# Altium PCB PCB-PWR.PcbDoc (part 1 of 2)
Units mm, origin at the board's own origin, x right, y up, seen from the top; angles counter-clockwise.
Board outline 90 x 60 mm, 4 copper layers (F.Cu, In1.Cu, In2.Cu, B.Cu); 66 components, 31 nets, 210 pads, 267 vias.
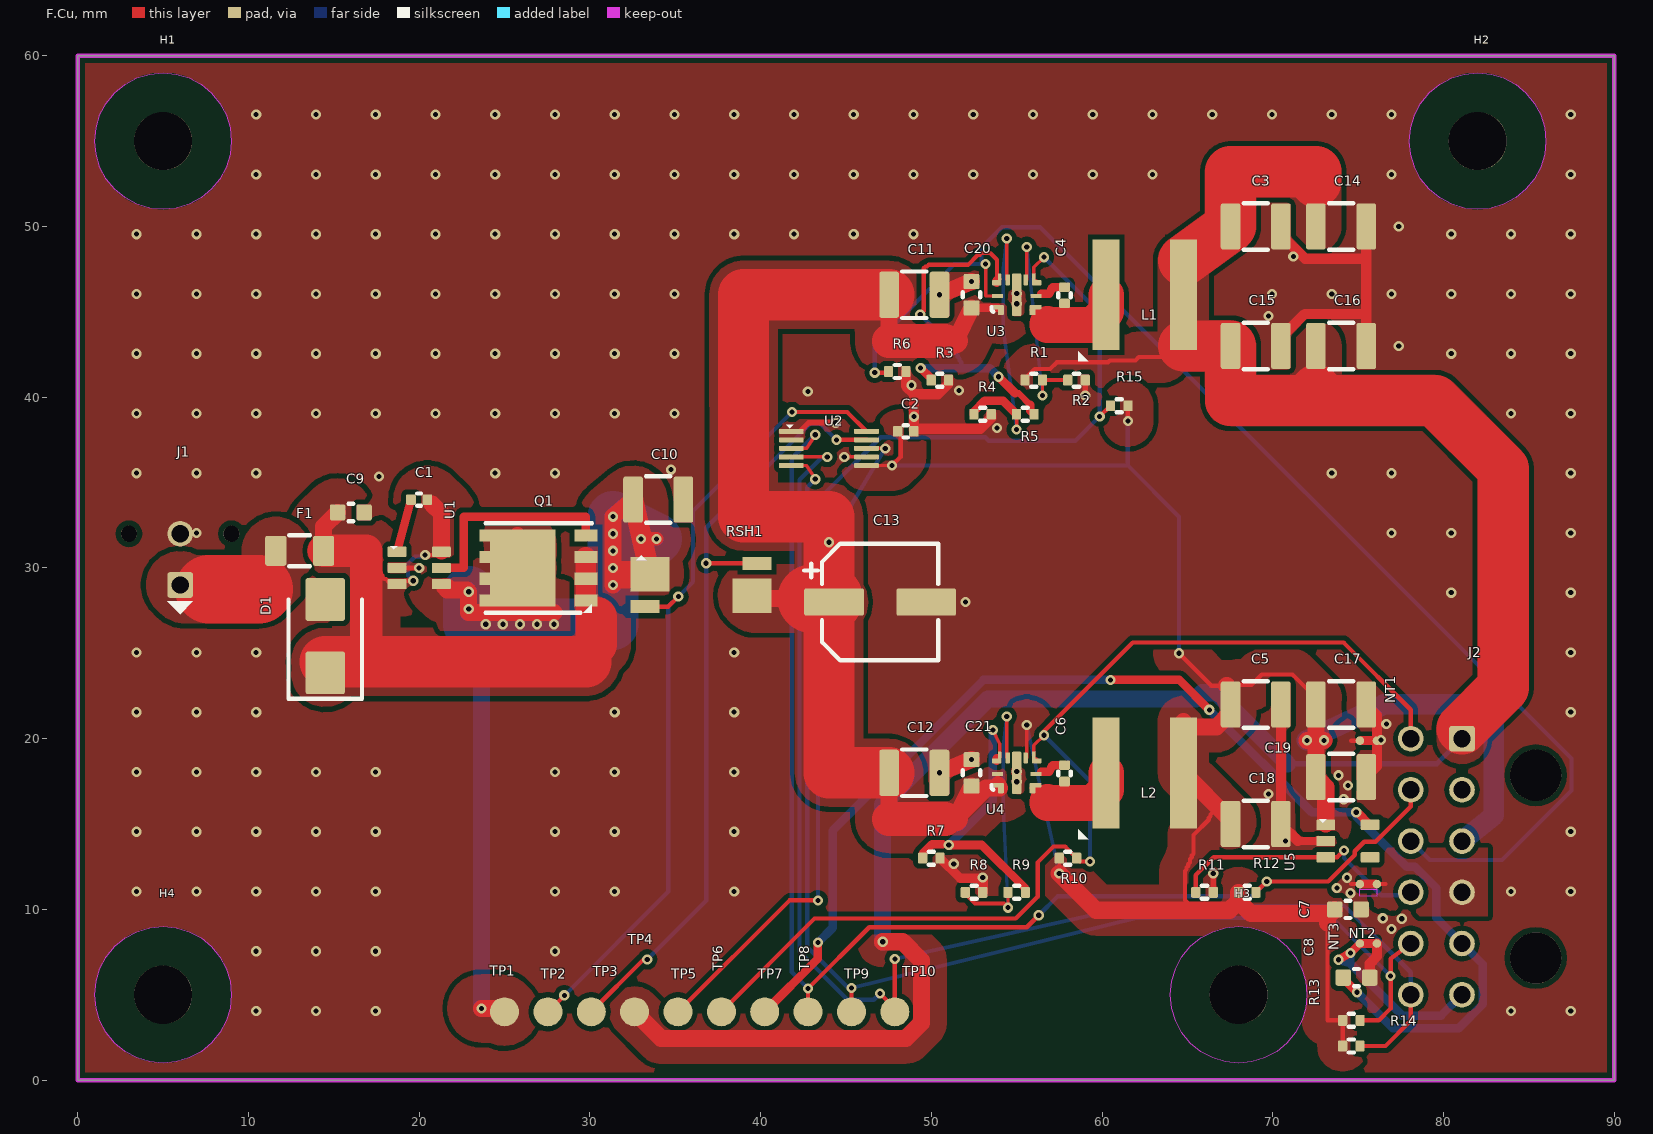
[diagram p0: F.Cu view]
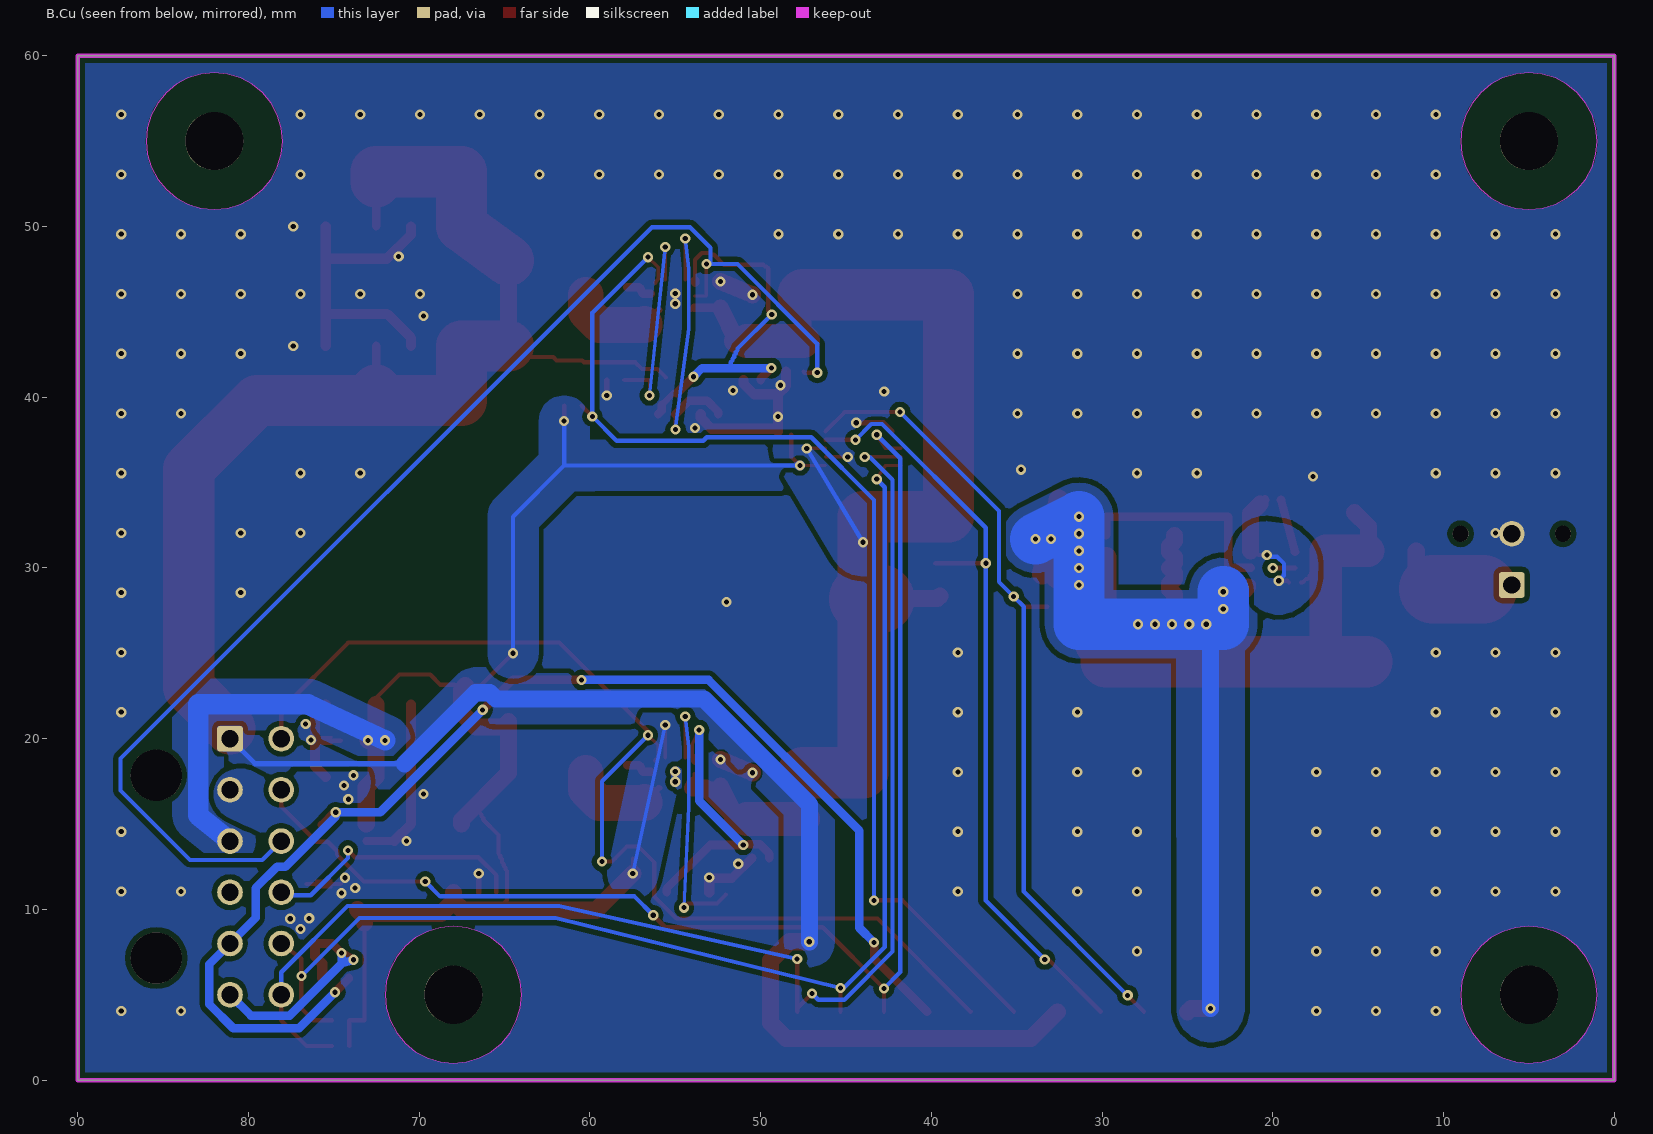
[diagram p1: B.Cu view, seen from below]
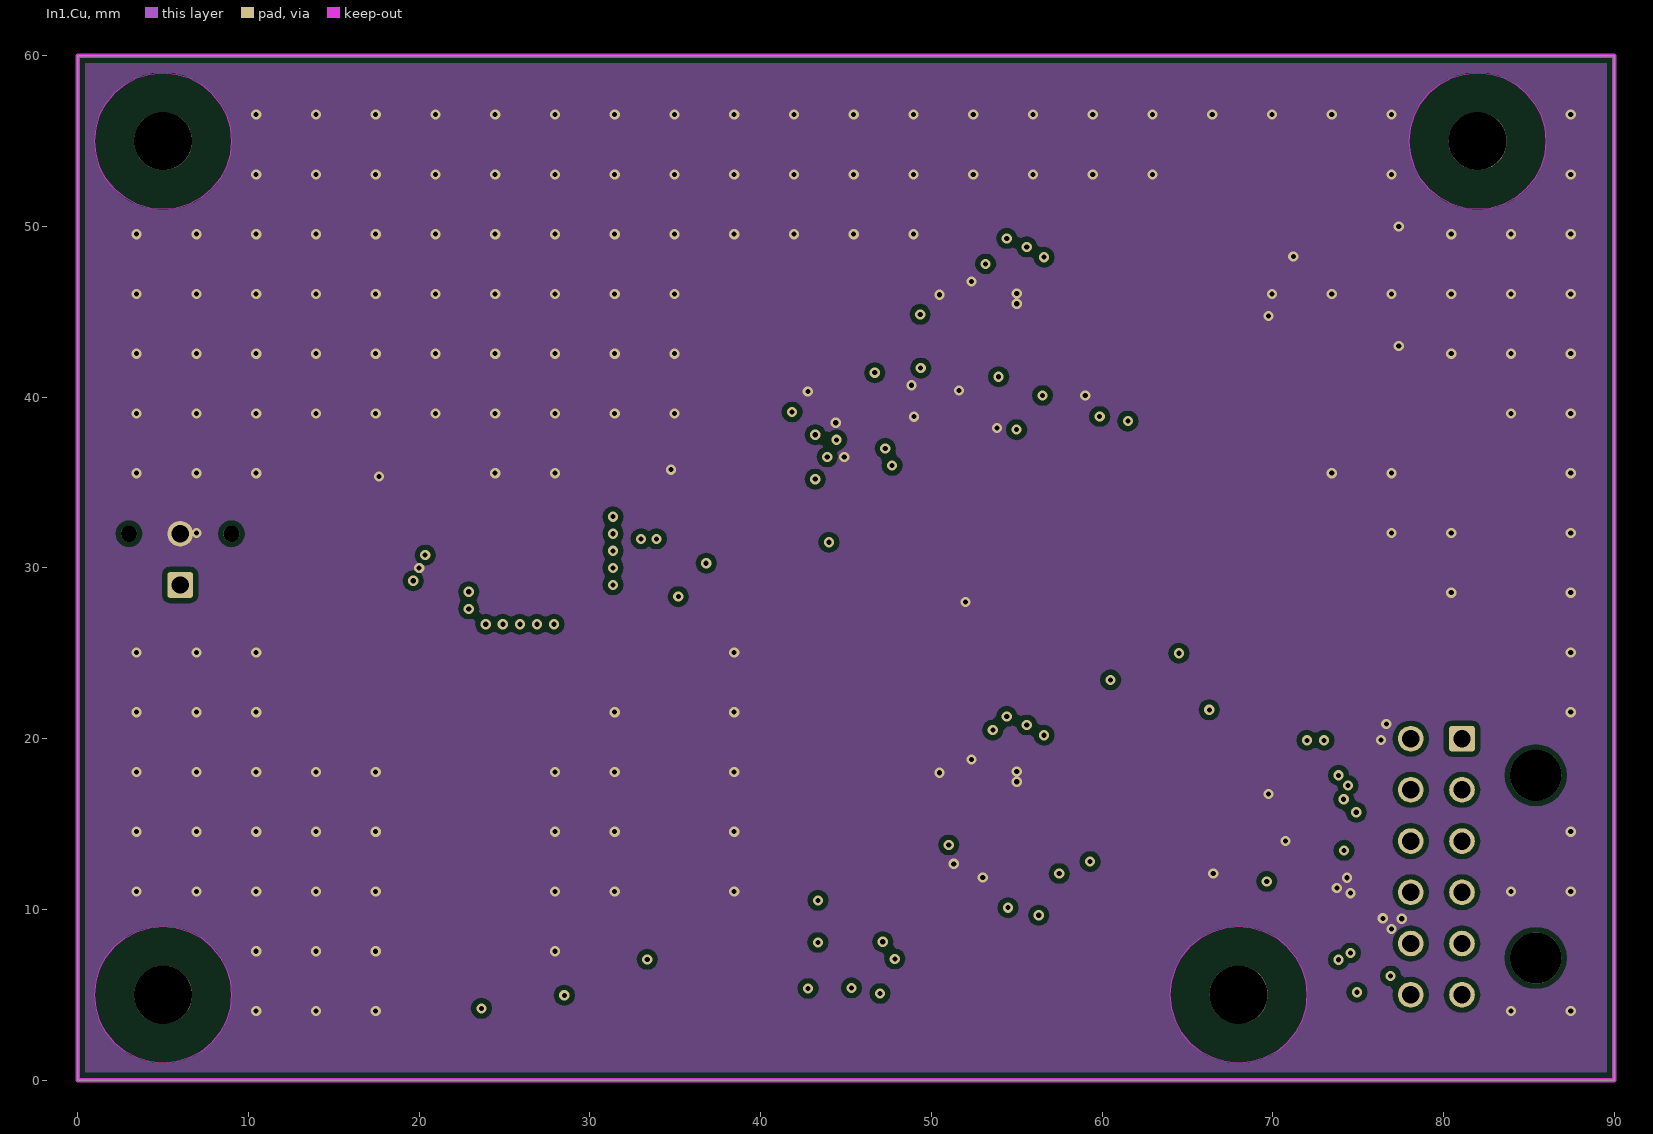
[diagram p2: In1.Cu]
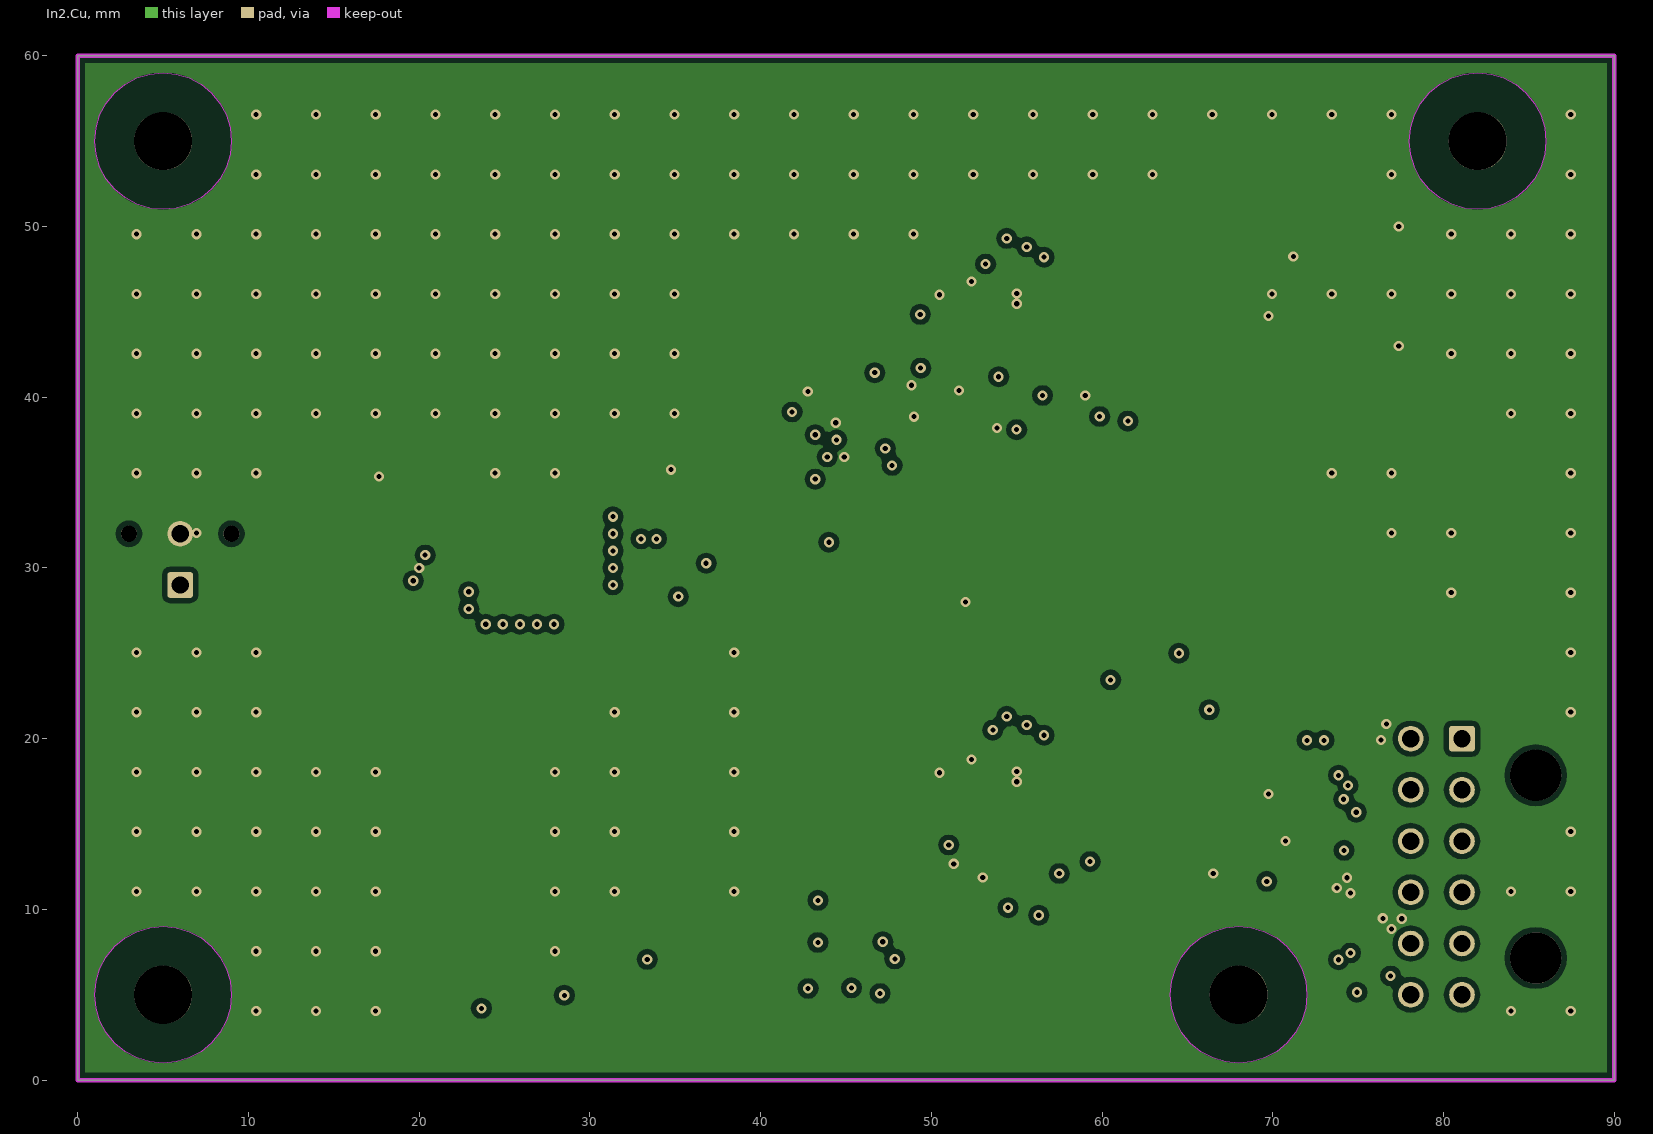
[diagram p3: In2.Cu]

## Layer stack, top to bottom
F.Mask: solder mask 0.0102, Solder Resist, Dk 3.5
F.Cu: signal copper 0.0356
Dielectric 1: dielectric 0.32, FR-4, Dk 4.8
In1.Cu: signal copper 0.0356
Dielectric2: dielectric 0.32, FR-4, Dk 4.8
In2.Cu: signal copper 0.0356
Dielectric3: dielectric 0.32, FR-4, Dk 4.8
B.Cu: signal copper 0.0356
B.Mask: solder mask 0.0102, Solder Resist, Dk 3.5

## Board outline
0,0 0,60 90,60 90,0 0,0

## Design rules (kind name [scope] priority, off if disabled: settings)
Clearance "Clearence 2,3_PadClass" [InPadClass('Pad Class Clearance 2,3')] p1: gap=2.3 ignorepadtopadclearanceinfootprint=FALSE
Clearance "Clearence 0,3_Polygon" [InNamedPolygon('F.Cu-3V3_DIGITAL') OR InNamedPolygon('F.Cu-VBAT_SYS') OR InNamedPolygon('F.Cu-3V8_MODEM') OR InNamedPolygon('F.Cu-VBAT_PROTECTED') OR InNamedPolygon('F.Cu-VBAT_PROTECTED-1') OR InNamedPolygon('F.Cu-3V3_DIGITAL-1') OR InNamedPolygon('F.Cu-GND_MODEM') OR InNamedPolygon('F.Cu-3V3_DIGITAL-2') OR InNamedPolygon('F.Cu-GND_DIGITAL') OR InNamedPolygon('F.Cu-VBAT_FUSED') OR InNamedPolygon('F.Cu-3V8_MODEM-1') OR InNamedPolygon('F.Cu-GND_PWR') OR InNamedPolygon('F.Cu-3V3_DIGITAL-3') OR InNamedPolygon('F.Cu-VBAT_SYS-1') OR InNamedPolygon('F.Cu-VBAT_RAW') OR InNamedPolygon('B.Cu-3V3_DIGITAL') OR InNamedPolygon('B.Cu-3V3_DIGITAL-1') OR InNamedPolygon('B.Cu-GND_MODEM') OR InNamedPolygon('B.Cu-GND_PWR') OR InNamedPolygon('B.Cu-VBAT_PROTECTED') OR InNamedPolygon('B.Cu-VBAT_SYS') OR InNamedPolygon('B.Cu-3V8_MODEM') OR InNamedPolygon('B.Cu-3V3_DIGITAL-2') OR InNamedPolygon('B.Cu-VBAT_FUSED') OR InNamedPolygon('In1.Cu-GND_PWR') OR InNamedPolygon('In1.Cu-GND_PWR-1') OR InNamedPolygon('In1.Cu-GND_PWR-2') OR InNamedPolygon('In2.Cu-GND_PWR')] p2: gap=0.3 ignorepadtopadclearanceinfootprint=FALSE
HoleSize [All] p1: absolutevalues=TRUE maxlimit=3.4 minlimit=0.025 maxpercent=80.000 minpercent=20.000
MinimumSolderMaskSliver [All] p1: minsoldermaskwidth=0
PolygonConnect Polygon_In2.Cu-GND_PWR_ConnectDirect [IsNamedPolygon('In2.Cu-GND_PWR')] p1: connectstyle=Direct reliefconductorwidth=0.254 reliefentries=4 polygonreliefangle="90 Angle" airgapwidth=0.254
PolygonConnect Polygon_In1.Cu-GND_PWR-2_ConnectDirect [IsNamedPolygon('In1.Cu-GND_PWR-2')] p2: connectstyle=Direct reliefconductorwidth=0.254 reliefentries=4 polygonreliefangle="90 Angle" airgapwidth=0.254
PolygonConnect Polygon_In1.Cu-GND_PWR-1_ConnectDirect [IsNamedPolygon('In1.Cu-GND_PWR-1')] p3: connectstyle=Direct reliefconductorwidth=0.254 reliefentries=4 polygonreliefangle="90 Angle" airgapwidth=0.254
PolygonConnect Polygon_In1.Cu-GND_PWR_ConnectDirect [IsNamedPolygon('In1.Cu-GND_PWR')] p4: connectstyle=Direct reliefconductorwidth=0.254 reliefentries=4 polygonreliefangle="90 Angle" airgapwidth=0.254
PolygonConnect Polygon_B.Cu-VBAT_FUSED_ConnectDirect [IsNamedPolygon('B.Cu-VBAT_FUSED')] p5: connectstyle=Direct reliefconductorwidth=0.254 reliefentries=4 polygonreliefangle="90 Angle" airgapwidth=0.254
PolygonConnect Polygon_B.Cu-3V3_DIGITAL-2_ConnectDirect [IsNamedPolygon('B.Cu-3V3_DIGITAL-2')] p6: connectstyle=Direct reliefconductorwidth=0.254 reliefentries=4 polygonreliefangle="90 Angle" airgapwidth=0.254
PolygonConnect Polygon_B.Cu-3V8_MODEM_ConnectDirect [IsNamedPolygon('B.Cu-3V8_MODEM')] p7: connectstyle=Direct reliefconductorwidth=0.254 reliefentries=4 polygonreliefangle="90 Angle" airgapwidth=0.254
PolygonConnect Polygon_B.Cu-VBAT_SYS_ConnectDirect [IsNamedPolygon('B.Cu-VBAT_SYS')] p8: connectstyle=Direct reliefconductorwidth=0.254 reliefentries=4 polygonreliefangle="90 Angle" airgapwidth=0.254
PolygonConnect Polygon_B.Cu-VBAT_PROTECTED_ConnectDirect [IsNamedPolygon('B.Cu-VBAT_PROTECTED')] p9: connectstyle=Direct reliefconductorwidth=0.254 reliefentries=4 polygonreliefangle="90 Angle" airgapwidth=0.254
PolygonConnect Polygon_B.Cu-GND_PWR_ConnectDirect [IsNamedPolygon('B.Cu-GND_PWR')] p10: connectstyle=Direct reliefconductorwidth=0.254 reliefentries=4 polygonreliefangle="90 Angle" airgapwidth=0.254
PolygonConnect Polygon_B.Cu-GND_MODEM_ConnectDirect [IsNamedPolygon('B.Cu-GND_MODEM')] p11: connectstyle=Direct reliefconductorwidth=0.254 reliefentries=4 polygonreliefangle="90 Angle" airgapwidth=0.254
PolygonConnect Polygon_B.Cu-3V3_DIGITAL-1_ConnectDirect [IsNamedPolygon('B.Cu-3V3_DIGITAL-1')] p12: connectstyle=Direct reliefconductorwidth=0.254 reliefentries=4 polygonreliefangle="90 Angle" airgapwidth=0.254
PolygonConnect Polygon_B.Cu-3V3_DIGITAL_ConnectDirect [IsNamedPolygon('B.Cu-3V3_DIGITAL')] p13: connectstyle=Direct reliefconductorwidth=0.254 reliefentries=4 polygonreliefangle="90 Angle" airgapwidth=0.254
PolygonConnect Polygon_F.Cu-VBAT_RAW_ConnectDirect [IsNamedPolygon('F.Cu-VBAT_RAW')] p14: connectstyle=Direct reliefconductorwidth=0.254 reliefentries=4 polygonreliefangle="90 Angle" airgapwidth=0.254
PolygonConnect Polygon_F.Cu-VBAT_SYS-1_ConnectDirect [IsNamedPolygon('F.Cu-VBAT_SYS-1')] p15: connectstyle=Direct reliefconductorwidth=0.254 reliefentries=4 polygonreliefangle="90 Angle" airgapwidth=0.254
PolygonConnect Polygon_F.Cu-3V3_DIGITAL-3_ConnectDirect [IsNamedPolygon('F.Cu-3V3_DIGITAL-3')] p16: connectstyle=Direct reliefconductorwidth=0.254 reliefentries=4 polygonreliefangle="90 Angle" airgapwidth=0.254
PolygonConnect Polygon_F.Cu-GND_PWR_ConnectDirect [IsNamedPolygon('F.Cu-GND_PWR')] p17: connectstyle=Direct reliefconductorwidth=0.254 reliefentries=4 polygonreliefangle="90 Angle" airgapwidth=0.254
PolygonConnect Polygon_F.Cu-3V8_MODEM-1_ConnectDirect [IsNamedPolygon('F.Cu-3V8_MODEM-1')] p18: connectstyle=Direct reliefconductorwidth=0.254 reliefentries=4 polygonreliefangle="90 Angle" airgapwidth=0.254
PolygonConnect Polygon_F.Cu-VBAT_FUSED_ConnectDirect [IsNamedPolygon('F.Cu-VBAT_FUSED')] p19: connectstyle=Direct reliefconductorwidth=0.254 reliefentries=4 polygonreliefangle="90 Angle" airgapwidth=0.254
PolygonConnect Polygon_F.Cu-GND_DIGITAL_ConnectDirect [IsNamedPolygon('F.Cu-GND_DIGITAL')] p20: connectstyle=Direct reliefconductorwidth=0.254 reliefentries=4 polygonreliefangle="90 Angle" airgapwidth=0.254
PolygonConnect Polygon_F.Cu-3V3_DIGITAL-2_ConnectDirect [IsNamedPolygon('F.Cu-3V3_DIGITAL-2')] p21: connectstyle=Direct reliefconductorwidth=0.254 reliefentries=4 polygonreliefangle="90 Angle" airgapwidth=0.254
PolygonConnect Polygon_F.Cu-GND_MODEM_ConnectDirect [IsNamedPolygon('F.Cu-GND_MODEM')] p22: connectstyle=Direct reliefconductorwidth=0.254 reliefentries=4 polygonreliefangle="90 Angle" airgapwidth=0.254
PolygonConnect Polygon_F.Cu-3V3_DIGITAL-1_ConnectDirect [IsNamedPolygon('F.Cu-3V3_DIGITAL-1')] p23: connectstyle=Direct reliefconductorwidth=0.254 reliefentries=4 polygonreliefangle="90 Angle" airgapwidth=0.254
PolygonConnect Polygon_F.Cu-VBAT_PROTECTED-1_ConnectDirect [IsNamedPolygon('F.Cu-VBAT_PROTECTED-1')] p24: connectstyle=Direct reliefconductorwidth=0.254 reliefentries=4 polygonreliefangle="90 Angle" airgapwidth=0.254
PolygonConnect Polygon_F.Cu-VBAT_PROTECTED_ConnectDirect [IsNamedPolygon('F.Cu-VBAT_PROTECTED')] p25: connectstyle=Direct reliefconductorwidth=0.254 reliefentries=4 polygonreliefangle="90 Angle" airgapwidth=0.254
PolygonConnect Polygon_F.Cu-3V8_MODEM_ConnectDirect [IsNamedPolygon('F.Cu-3V8_MODEM')] p26: connectstyle=Direct reliefconductorwidth=0.254 reliefentries=4 polygonreliefangle="90 Angle" airgapwidth=0.254
PolygonConnect Polygon_F.Cu-VBAT_SYS_ConnectDirect [IsNamedPolygon('F.Cu-VBAT_SYS')] p27: connectstyle=Direct reliefconductorwidth=0.254 reliefentries=4 polygonreliefangle="90 Angle" airgapwidth=0.254
PolygonConnect Polygon_F.Cu-3V3_DIGITAL_ConnectDirect [IsNamedPolygon('F.Cu-3V3_DIGITAL')] p28: connectstyle=Direct reliefconductorwidth=0.254 reliefentries=4 polygonreliefangle="90 Angle" airgapwidth=0.254
RoutingVias [All] p1: holewidth=0.711 width=1.27 viastyle="Through Hole" minholewidth=0.711 minwidth=1.27 maxholewidth=0.711 maxwidth=1.27
SilkToSilkClearance [All] p1: silktosilkclearance=0
SilkToSolderMaskClearance [IsPad] p1: minsilkscreentomaskgap=0 clearancetoexposedcopper=TRUE
SolderMaskExpansion [All] p1: expansion=0 istentingtop=FALSE
Width [All] p1: maxlimit=10 minlimit=0.2 preferedwidth=0.25 minimp=50.000000 maximp=50.000000 favimp=50.000000
26 further rules are at their usual default settings.

## Classes and differential pairs
pad class "Pad Class Clearance 2,3": H1-Un1 H2-Un1 H3-Un1 H4-Un1

## Components (designator, comment, footprint, x,y, rotation, side; value= is the part's Value field where it differs from the comment)
C1 "Comment" C_0402_1005Metric 20,34 r0 top value="100 nF 25 V X7R CGA2B3X7R1E104K050BB"
C2 "Comment" C_0402_1005Metric 48.5,38 r0 top value="100 nF 25 V X7R CGA2B3X7R1E104K050BB"
C3 "Comment" C_1210_3225Metric 69,50 r0 top value="22 uF 25 V X7R CGA6P3X7R1E226M250AB"
C4 "Comment" C_0402_1005Metric 57.8,45.97 r270 top value="100 nF 25 V X7R CGA2B3X7R1E104K050BB"
C5 "Comment" C_1210_3225Metric 69,22 r0 top value="22 uF 25 V X7R CGA6P3X7R1E226M250AB"
C6 "Comment" C_0402_1005Metric 57.8,17.97 r270 top value="100 nF 25 V X7R CGA2B3X7R1E104K050BB"
C7 "Comment" C_0603_1608Metric 74.4,10 r0 top value="2.2 uF 10 V X7R CGA3E1X7R1A225K080AC"
C8 "Comment" C_0603_1608Metric 74.9,6 r0 top value="2.2 uF 10 V X7R CGA3E1X7R1A225K080AC"
C9 "Comment" C_0603_1608Metric 16,33.25 r0 top value="100 nF 50 V X7R CGA3E2X7R1H104K080AA"
C10 "Comment" C_1210_3225Metric 34,34 r0 top value="4.7 uF 50 V X7R CGA6P3X7R1H475K250AB"
C11 "Comment" C_1210_3225Metric 49,46 r0 top value="4.7 uF 50 V X7R CGA6P3X7R1H475K250AB"
C12 "Comment" C_1210_3225Metric 49,18 r0 top value="4.7 uF 50 V X7R CGA6P3X7R1H475K250AB"
C13 "Comment" CP_Elec_6.3x7.7 47,28 r0 top value="100 uF 35 V hybrid EEH-ZK1V101XP"
C14 "Comment" C_1210_3225Metric 74,50 r0 top value="22 uF 25 V X7R CGA6P3X7R1E226M250AB"
C15 "Comment" C_1210_3225Metric 69,43 r0 top value="22 uF 25 V X7R CGA6P3X7R1E226M250AB"
C16 "Comment" C_1210_3225Metric 74,43 r0 top value="22 uF 25 V X7R CGA6P3X7R1E226M250AB"
C17 "Comment" C_1210_3225Metric 74,22 r0 top value="22 uF 25 V X7R CGA6P3X7R1E226M250AB"
C18 "Comment" C_1210_3225Metric 69,15 r0 top value="22 uF 25 V X7R CGA6P3X7R1E226M250AB"
C19 "Comment" C_1210_3225Metric 74,17.75 r0 top value="22 uF 25 V X7R CGA6P3X7R1E226M250AB"
C20 "Comment" C_0603_1608Metric 52.35,46 r90 top value="100 nF 50 V X7R CGA3E2X7R1H104K080AA"
C21 "Comment" C_0603_1608Metric 52.35,18 r90 top value="100 nF 50 V X7R CGA3E2X7R1H104K080AA"
D1 "Comment" D_SMB 14.5,26 r90 top value="SMBJ18A CANDIDATE"
F1 "Comment" Fuse_1206_3216Metric 13,31 r0 top value=0451008.MRL
H1 "Comment" MountingHole_M3_3.4_EVT 5,55 r0 top value=M3_CLEARANCE_NPTH_3.4
H2 "Comment" MountingHole_M3_3.4_EVT 82,55 r0 top value=M3_CLEARANCE_NPTH_3.4
H3 "Comment" MountingHole_M3_3.4_EVT 68,5 r0 top value=M3_CLEARANCE_NPTH_3.4
H4 "Comment" MountingHole_M3_3.4_EVT 5,5 r0 top value=M3_CLEARANCE_NPTH_3.4
J1 "Comment" Molex_43045-0213_MicroFit-2_Vertical 6,32 r0 top value=43045-0213
J2 "Comment" Molex_43045-1202_MicroFit-12_RA 81.08,20 r270 top value=43045-1202
L1 "Comment" Coilcraft_XAL7030_472 62.5,46 r180 top value=XAL7030-472MEC
L2 "Comment" Coilcraft_XAL7030_472 62.5,18 r180 top value=XAL7030-472MEC
NT1 "Comment" NETTIE-2_SMD_PAD0.5MM 75.6,19.88 r0 top net-tie value="2-pad copper net tie NET_TIE_COPPER_REV_A"
NT2 "Comment" NETTIE-2_SMD_PAD0.5MM 75.6,11.48 r180 top net-tie value="2-pad copper net tie NET_TIE_COPPER_REV_A"
NT3 "Comment" NETTIE-2_SMD_PAD0.5MM 75.6,8 r0 top net-tie value="2-pad copper net tie NET_TIE_COPPER_REV_A"
Q1 "Comment" CSD18540Q5B_DNK 27,30 r0 top value=CSD18540Q5B
R1 "Comment" R_0402_1005Metric 56,41 r0 top value="100 kOhm 0.1% ERA-2AEB104X"
R2 "Comment" R_0402_1005Metric 58.5,41 r0 top value="35.7 kOhm 0.1% ERA-2AEB3572X"
R3 "Comment" R_0402_1005Metric 50.5,41 r0 top value="86.6 kOhm 0.1% ERA-2AEB8662X"
R4 "Comment" R_0402_1005Metric 53,39 r0 top value="0 ohm ERJ-2GE0R00X"
R5 "Comment" R_0402_1005Metric 55.5,39 r0 top value="0 ohm ERJ-2GE0R00X"
R6 "Comment" R_0402_1005Metric 48,41.5 r0 top value="100 kOhm 1% ERJ-2RKF1003X"
R7 "Comment" R_0402_1005Metric 50,13 r0 top value="86.6 kOhm 0.1% ERA-2AEB8662X"
R8 "Comment" R_0402_1005Metric 52.5,11 r0 top value="0 ohm ERJ-2GE0R00X"
R9 "Comment" R_0402_1005Metric 55,11 r0 top value="0 ohm ERJ-2GE0R00X"
R10 "Comment" R_0402_1005Metric 58,13 r0 top value="10 kOhm 1% ERJ-2RKF1002X"
R11 "Comment" R_0402_1005Metric 66,11 r0 top value="100 kOhm 1% ERJ-2RKF1003X"
R12 "Comment" R_0402_1005Metric 68.5,11 r0 top value="10 kOhm 1% ERJ-2RKF1002X"
R13 "Comment" R_0402_1005Metric 74.6,3.5 r0 top value="4.7 kOhm 1% ERJ-2RKF4701X"
R14 "Comment" R_0402_1005Metric 74.6,2 r0 top value="4.7 kOhm 1% ERJ-2RKF4701X"
R15 "Comment" R_0402_1005Metric 61,39.5 r0 top value="10 kOhm 1% ERJ-2RKF1002X"
RSH1 "Comment" Vishay_WSK2512_4T_T1.19mm 36.5,29 r0 top value=WSK2512R0100FEA
TP1 "Comment" TestPoint_DFT_1.7mm_NoPaste 25,4 r0 top value="TP_VBAT_PROTECTED DFT_PAD_1P70_NOPASTE_REV_A"
TP2 "Comment" TestPoint_DFT_1.7mm_NoPaste 27.54,4 r0 top value="TP_SHUNT_SRC DFT_PAD_1P70_NOPASTE_REV_A"
TP3 "Comment" TestPoint_DFT_1.7mm_NoPaste 30.08,4 r0 top value="TP_SHUNT_LOAD DFT_PAD_1P70_NOPASTE_REV_A"
TP4 "Comment" TestPoint_DFT_1.7mm_NoPaste 32.62,4 r0 top value="TP_3V8 DFT_PAD_1P70_NOPASTE_REV_A"
TP5 "Comment" TestPoint_DFT_1.7mm_NoPaste 35.16,4 r0 top value="TP_PG_3V8 DFT_PAD_1P70_NOPASTE_REV_A"
TP6 "Comment" TestPoint_DFT_1.7mm_NoPaste 37.7,4 r0 top value="TP_PWR_GOOD DFT_PAD_1P70_NOPASTE_REV_A"
TP7 "Comment" TestPoint_DFT_1.7mm_NoPaste 40.24,4 r0 top value="TP_1V8 DFT_PAD_1P70_NOPASTE_REV_A"
TP8 "Comment" TestPoint_DFT_1.7mm_NoPaste 42.78,4 r0 top value="TP_FAULT DFT_PAD_1P70_NOPASTE_REV_A"
TP9 "Comment" TestPoint_DFT_1.7mm_NoPaste 45.32,4 r0 top value="TP_SCL DFT_PAD_1P70_NOPASTE_REV_A"
TP10 "Comment" TestPoint_DFT_1.7mm_NoPaste 47.86,4 r0 top value="TP_SDA DFT_PAD_1P70_NOPASTE_REV_A"
U1 "Comment" TI_DBV0006A_SOT23-6 20,30 r0 top value=LM74700QDBVRQ1
U2 "Comment" TI_DGS0010A_VSSOP10 44,37 r0 top value=INA226AIDGSR
U3 "Comment" LMR60440_RAK0009A 55,46 r90 top value=LMR604403SRAKR
U4 "Comment" LMR60440_RAK0009A 55,18 r90 top value=LMR604403SRAKR
U5 "Comment" TI_DBV0005A_SOT23-5 74.4,14 r0 top value=TPS7A2018PDBVR

## Footprints (in the part's own frame and the unit in brackets; to place one, negate y for a bottom-side part, rotate by r counter-clockwise, add the part's x,y. Pads: shape width x height; smd on the part's side, far side on the other; paste and mask are expansions set on the pad)
C_0402_1005Metric [mm]
  rrect25% 0.56x0.62 smd mask+0: 1(-0.48,0) 2(0.48,0)
  silkscreen extent -0.11,-0.36 0.11,0.36
C_0603_1608Metric [mm]
  rrect25% 0.9x0.95 smd mask+0: 1(-0.775,0) 2(0.775,0)
  silkscreen extent -0.14,-0.51 0.14,0.51
C_1210_3225Metric [mm]
  rrect22% 1.15x2.7 smd mask+0: 1(-1.475,0) 2(1.475,0)
  silkscreen extent -0.71,-1.36 0.71,1.36
Coilcraft_XAL7030_472 [mm]
  rect 1.58x6.5 smd mask+0: 1(2.26,0) 2(-2.26,0)
  silkscreen extent 3.3,3.3 3.9,3.9
CP_Elec_6.3x7.7 [mm]
  rrect16% 3.5x1.6 smd mask+0: 1(-2.7,0) 2(2.7,0)
  silkscreen extent -4.44,-3.41 3.41,3.41
CSD18540Q5B_DNK [mm]
  rect 1.372x0.71 smd paste-1.372 mask+0: 1(2.77,-1.905) 2(2.77,-0.635) 3(2.77,0.635) 4(2.77,1.905)
  rect 4.44x0.71 smd paste-4.44 mask+0: 5(-1.236,1.905) 6(-1.236,0.635) 7(-1.236,-0.635) 8(-1.236,-1.905)
  rect 3.85x0.56 smd paste-3.85 mask+0: 5(-0.941,-1.27) 5(-0.941,0) 5(-0.941,1.27)
  rect 0.766x0.508 on Top Paste mask-0.766: Un1(-2.91,1.905) Un2(-2.91,0.635) Un3(-2.91,-0.635) Un4(-2.91,-1.905)
  rect 1.294x0.746 on Top Paste mask-1.294: Un5(-1.594,1.569) Un6(-1.594,0.523) Un7(-1.594,-0.523) Un8(-1.594,-1.569) Un9(0.05,1.569) Un10(0.05,0.523) Un11(0.05,-0.523) Un12(0.05,-1.569)
  rect 1.072x0.562 on Top Paste mask-1.072: Un13(2.758,1.905) Un14(2.758,0.635) Un15(2.758,-0.635) Un16(2.758,-1.905)
  silkscreen extent -3.12,-2.62 3.12,2.62
D_SMB [mm]
  rrect11% 2.5x2.3 smd mask+0: 1(-2.15,0) 2(2.15,0)
  silkscreen extent -3.66,-2.15 2.15,2.15
Fuse_1206_3216Metric [mm]
  rrect20% 1.25x1.75 smd mask+0: 1(-1.4,0) 2(1.4,0)
  silkscreen extent -0.6,-0.91 0.6,0.91
LMR60440_RAK0009A [mm]
  rrect29% 0.6x0.345 smd paste-0.6 mask+0.05: 1(-0.9,0.927) 3(-0.9,-0.927)
  rrect40% 0.25x0.695 smd paste-0.695 mask+0.05: 1(-0.725,1.102) 3(-0.725,-1.102)
  rrect36% 2.5x0.55 smd paste-2.5 mask-2.5: 2(0,0)
  rrect40% 0.25x0.65 smd mask+0.05: 4(-0.075,-1.125) 9(-0.075,1.125)
  rrect33% 0.3x0.55 smd mask+0.05: 5(0.7,-1.175) 8(0.7,1.175)
  rrect50% 0.7x0.2 smd mask+0.05: 5(0.9,-1) 8(0.9,1)
  rrect40% 0.65x0.25 smd mask+0.05: 6(0.875,-0.525) 7(0.875,0.525)
  rrect29% 0.56x0.345 on Top Paste mask-0.56: Un1(-0.92,0.927) Un2(-0.92,-0.927)
  rrect48% 0.21x0.695 on Top Paste mask-0.695: Un3(-0.745,1.102) Un4(-0.745,-1.102)
  rrect24% 1.1x0.41 on Top Paste mask-1.1: Un5(-0.65,0)
  rect 0.01x0.01 on Top Solder paste-0.01 mask-0.01: Un6(0,0)
  rrect33% 1.1x0.3 on Top Paste mask-1.1: Un7(0.65,0)
  silkscreen extent -1,1.38 -0.72,1.48
Molex_43045-0213_MicroFit-2_Vertical [mm]
  rrect20% 1.5x1.5 hole 1.02 paste-2539.97 mask+0: 1(0,-3)
  round 1.5 hole 1.02 paste-2539.97 mask+0: 2(0,0)
  round 0.94 hole 0.94 paste-2539.97 mask+0: Un1(-3,0) Un2(3,0)
  silkscreen extent -0.75,-4.7 0.75,-3.95
Molex_43045-1202_MicroFit-12_RA [mm]
  rrect20% 1.5x1.5 hole 1.02 paste-2539.97 mask+0: 1(0,0)
  round 1.5 hole 1.02 paste-2539.97 mask+0: 2(3,0) 3(6,0) 4(9,0) 5(12,0) 6(15,0) 7(0,-3) 8(3,-3) 9(6,-3) 10(9,-3) 11(12,-3) 12(15,-3)
  round 3 hole 3 paste-2539.97 mask+0: Un1(2.15,4.32) Un2(12.85,4.32)
MountingHole_M3_3.4_EVT [mm]
  round 3.4 hole 3.4 paste-2539.97 mask+0: Un1(0,0)
NETTIE-2_SMD_PAD0.5MM [mm]
  round 0.5 smd: 1(-0.5,0) 2(0.5,0)
  F.Cu region: 0.5,-0.25 -0.5,-0.25 -0.5,0.25 0.5,0.25
R_0402_1005Metric [mm]
  rrect25% 0.54x0.64 smd mask+0: 1(-0.51,0) 2(0.51,0)
  silkscreen extent -0.15,-0.38 0.15,0.38
TestPoint_DFT_1.7mm_NoPaste [mm]
  round 1.7 smd paste-1.7 mask+0.1: 1(0,0)
TI_DBV0005A_SOT23-5 [mm]
  rrect17% 1.1x0.6 smd mask+0.07: 1(-1.3,0.95) 2(-1.3,0) 3(-1.3,-0.95) 4(1.3,-0.95) 5(1.3,0.95)
  silkscreen extent -1.68,1.08 -1.28,1.28
TI_DBV0006A_SOT23-6 [mm]
  rrect17% 1.1x0.6 smd mask+0.07: 1(-1.3,0.95) 2(-1.3,0) 3(-1.3,-0.95) 4(1.3,-0.95) 5(1.3,0) 6(1.3,0.95)
  silkscreen extent -1.68,1.08 -1.28,1.28
TI_DGS0010A_VSSOP10 [mm]
  rrect33% 1.45x0.3 smd mask+0.05: 1(-2.2,1) 2(-2.2,0.5) 3(-2.2,0) 4(-2.2,-0.5) 5(-2.2,-1) 6(2.2,-1) 7(2.2,-0.5) 8(2.2,0) 9(2.2,0.5) 10(2.2,1)
  silkscreen extent -2.5,1.18 -2.1,1.38
Vishay_WSK2512_4T_T1.19mm [mm]
  rect 2.29x2.03 smd mask+0: 1(-2.985,0.635) 2(2.985,-0.635)
  rect 1.7x0.76 smd mask+0: 3(-3.28,-1.27) 4(3.28,1.27)
  silkscreen extent -3.8,1.45 -3.2,1.75

## Part data
C1 C2 C4 C6: library part C_0402_1005Metric, "DIONEA_PCB_PWR_REV_A"
C3 C5 C10 C11 C12 C14 C15 C16 C17 C18 C19: library part C_1210_3225Metric, "DIONEA_PCB_PWR_REV_A"
C7 C8 C9 C20 C21: library part C_0603_1608Metric, "DIONEA_PCB_PWR_REV_A"
C13: library part CP_Elec_6.3x7.7, "DIONEA_PCB_PWR_REV_A"
D1: library part D_SMB, "DIONEA_PCB_PWR_REV_A"
F1: library part Fuse_1206_3216Metric, "DIONEA_PCB_PWR_REV_A"
H1 H2 H3 H4: library part MountingHole_M3_3.4_EVT, "DIONEA_PCB_PWR_EVT_MOUNT", Description="EVT DIM-003 M3 mounting hole"
J1: library part Molex_43045-0213_MicroFit-2_Vertical, "DIONEA_PCB_PWR_REV_A"
J2: library part Molex_43045-1202_MicroFit-12_RA, "DIONEA_PCB_PWR_REV_A"
L1 L2: library part Coilcraft_XAL7030_472, "DIONEA_PCB_PWR_REV_A"
NT1 NT2 NT3: library part NetTie-2_SMD_Pad0.5mm, "DIONEA_PCB_PWR_REV_A"
Q1: library part CSD18540Q5B_DNK, "DIONEA_PCB_PWR_REV_A"
R1 R2 R3 R4 R5 R6 R7 R8 R9 R10 R11 R12 R13 R14 R15: library part R_0402_1005Metric, "DIONEA_PCB_PWR_REV_A"
RSH1: library part Vishay_WSK2512_4T_T1.19mm, "DIONEA_PCB_PWR_REV_A"
TP1 TP2 TP3 TP4 TP5 TP6 TP7 TP8 TP9 TP10: library part TestPoint_DFT_1.7mm_NoPaste, "DIONEA_PCB_PWR_REV_A"
U1: library part TI_DBV0006A_SOT23-6, "DIONEA_PCB_PWR_REV_A"
U2: library part TI_DGS0010A_VSSOP10, "DIONEA_PCB_PWR_REV_A"
U3 U4: library part LMR60440_RAK0009A, "DIONEA_PCB_PWR_REV_A"
U5: library part TI_DBV0005A_SOT23-5, "DIONEA_PCB_PWR_REV_A"

## Via types
v1: diameter 0.6, hole 0.3, F.Cu to B.Cu, tented both sides, 267 vias

## Nets (pads, with @x,y where several pads share a name; then routed paths per layer and width w, separated by ;. In a path a pad name is that pad's centre, name@x,y a point inside that pad or via, vN(x,y) a via of type N, cw(c..) or ccw(c..) an arc to the next point about the centre after c; other vN are vias at no path point)
1V8_MIC: C8.1 J2.5 TP7.1 U5.5 | length 75.5
  F.Cu w0.5: TP7.1@40.24,4 43.353,7.113 v1(43.353,8.061) ; v1(60.496,23.439) 64.528,23.439 v1(66.282,21.686) ; C8.1@74.125,6 74.125,5.947 v1(74.926,5.146) ; v1(74.884,15.685) 74.965,15.685 U5.5@75.7,14.95
  B.Cu w0.5: v1(43.353,8.061) 44.219,8.927 44.219,14.61 53.048,23.439 v1(60.496,23.439) ; v1(66.282,21.686) 72.282,15.685 v1(74.884,15.685) 74.884,15.448 77.832,12.5 78.325,12.5 79.58,11.245 79.58,9.5 J2.5@81.08,8 82.287,6.793 82.287,4.433 80.895,3.042 77.03,3.042 v1(74.926,5.146)
3V3_DIGITAL: C2.1 C5.1 C7.1 C17.1 C18.1 C19.1 J2.3 L2.2 R10.1 R12.1 R13.1 R14.1 R15.2 U2.6 U4.6 U5.1 | length 130.3
  F.Cu w0.2: U2.6@46.2,36 v1(47.7,36) ; U4.6@55.585,18.875 v1(55.585,20.8) ; v1(57.49,12.1) R10.1@57.49,13
  F.Cu w0.25: v1(47.7,36) 48.2,36.5 C2.1@48.2,37.8 ; v1(61.51,38.6) R15.2@61.51,39.5 ; v1(64.5,25) 66.4,23.1 C5.1@67.3,23.1 ; 66.55,15.75 66.35,15.55 66.35,15.45 66.25,15.35 66.25,15.25 65.35,14.35 65.35,13.25 65.25,13.15 65.25,13.05 65.15,12.95 65.15,12.75 65.05,12.65 65.05,12.55 64.95,12.45 64.95,12.35 64.85,12.25 64.85,10.55 65.05,10.35 66.25,10.35 66.45,10.15 67.15,10.15 ; C5.1@67.95,23.15 68.75,23.15 69.35,23.75 71.15,23.75 C17.1@72.55,22.35 ; C7.1@73.625,9.7 73.2,9.2 73.2,3.5 R13.1@74.09,3.5 R14.1@74.09,2
  F.Cu w0.601: U5.1@73.1,14.95 U5.1@73.1,15.002
  F.Cu w1: v1(57.49,12.1) 59.642,9.947 67.454,9.947 67.99,10.483 ; C5.1@67.3,23.1 67.525,22.875 C5.1@67.525,22 67.525,21.512 66.696,20.684 65.086,20.684 64.76,21.01 L2.2@64.76,18 67.525,15.235 C18.1@67.525,15 ; R12.1@67.99,11 67.99,10.483 ; v1(72,19.9) v1(73,19.9) ; C17.1@72.525,22 C19.1@72.525,17.75 73.1,17.175 U5.1@73.1,15.002 ; 73.2,9.2 C7.1@73.2,9.762 ; C7.1@73.625,10 73.387,9.762 C7.1@73.2,9.762 ; 67.99,10.483 68.711,9.762 C7.1@73.2,9.762
  B.Cu w0.2: v1(55.585,20.8) v1(57.49,12.1)
  B.Cu w0.25: v1(47.7,36) 61.51,36 ; v1(61.51,38.6) 61.51,36 ; v1(64.5,25) 64.5,33 61.51,36
  B.Cu w1.2: v1(72,19.9) 76.5,22 82.95,22 82.95,15.5 J2.3@81.08,14
3V8_MODEM: C3.1 C14.1 C15.1 C16.1 J2.1 L1.2 R1.1 TP4.1 | length 143.1
  F.Cu w0.25: R1.1@55.55,41.15 56.05,41.65 56.95,41.65 57.35,42.05 60.35,42.05 60.45,42.15 61.95,42.15 62.15,42.35 63.55,42.35
  F.Cu w0.5: 72.525,40.4 C16.1@72.525,43 ; C14.1@72.525,50 72.525,52.6
  F.Cu w1: TP4.1@32.62,4 34.172,2.448 48.516,2.448 49.412,3.343 49.412,7.012 48.322,8.102 v1(47.15,8.102) ; L1.2@64.76,43 L1.2@64.76,46 L1.2@64.76,48 ; J2.1@81.08,20 J2.1@81.08,20.58
  F.Cu w3: L1.2@64.76,43 C15.1@67.525,43 67.525,39.8 72.525,39.8 ; L1.2@64.76,48 C3.1@67.525,50 67.525,53.2 72.525,53.2 72.525,52.6 ; 72.525,40.4 72.525,39.8 ; J2.1@81.08,20.58 83.5,23 83.5,35.8 79.5,39.8 72.525,39.8
  B.Cu w0.3: 70.857,18.526 79.607,18.526 J2.1@81.08,20
  B.Cu w1: v1(47.15,8.102) 47.15,16.154 53.326,22.331 65.51,22.331 65.867,22.687 66.696,22.687 70.857,18.526
BOOT_3V3: C6.1 U4.4 | length 1.6
  F.Cu w0.5: 56.45,18.05 56.9,18.05 57.1,18.45 57.49,18.45 C6.1@57.8,18.45
BOOT_3V8: C4.1 U3.4 | length 1.6
  F.Cu w0.5: 56.45,46.05 56.9,46.05 57.1,46.45 57.49,46.45 C4.1@57.8,46.45
EN_AUX: J2.10 R11.1 U5.3 | length 15.6
  F.Cu w0.25: R11.1@65.49,11 65.49,12.004 66.536,13.05 U5.3@73.1,13.05 73.769,13.05 v1(74.172,13.453)
  B.Cu w0.25: v1(74.172,13.453) 74.172,13.004 76.353,10.823 77.903,10.823 J2.10@78.08,11
EN_MODEM: J2.9 R6.1 U3.9 | length 75.9
  F.Cu w0.2: v1(53.175,47.8) 53.175,45.925 U3.9@53.875,45.925
  F.Cu w0.25: v1(46.684,41.435) 47.425,41.435 R6.1@47.49,41.5
  B.Cu w0.25: v1(46.684,41.435) 46.684,43.122 51.361,47.8 v1@52.936,47.8 ; v1(53.175,47.8) v1@52.936,47.8 ; J2.9@78.08,14 79.188,12.892 83.424,12.892 87.491,16.959 87.491,18.832 56.367,49.956 54.14,49.956 52.936,48.752 v1@52.936,47.8
FAULT: J2.8 R12.2 TP8.1 U2.3 | length 78.3
  F.Cu w0.2: U2.3@41.8,37 42.7,37 v1(43.2,37.8)
  F.Cu w0.25: TP8.1@42.78,4 v1(42.78,5.368) 46.363,8.951 55.585,8.951 v1(56.287,9.653) ; R12.2@69.01,11 v1(69.648,11.638) 73.243,11.638 74.799,13.194 74.799,13.407 75.356,13.963 76.014,13.963 78.08,16.03 J2.8@78.08,17
  B.Cu w0.25: v1(42.78,5.368) 41.823,6.325 41.823,36.423 v1(43.2,37.8) ; v1(56.287,9.653) 57.396,10.762 68.772,10.762 v1(69.648,11.638)
FB_3V8: R1.2 R2.1 U3.6 | length 13.1
  F.Cu w0.2: U3.6@55.585,46.875 v1(55.585,48.8) ; v1(56.51,40.1) R1.2@56.51,41
  F.Cu w0.25: R1.2@56.51,41 R2.1@57.99,41
  B.Cu w0.2: v1(55.585,48.8) v1(56.51,40.1)
GND_DIGITAL: J2.4 NT2.1 | length 0.5
  F.Cu w0.25: NT2.1@76.1,11.48 76.6,11.48
GND_MIC: J2.6 NT3.1 | length 11.2
  F.Cu w0.5: v1(73.85,7.05) v1(74.547,7.447) NT3.1@75.1,8
  B.Cu w0.5: v1(73.85,7.05) 74.55,6.82 ; v1(74.547,7.447) 74.547,6.817 77.585,3.779 79.859,3.779 J2.6@81.08,5
GND_MODEM: J2.2 NT1.1 | length 0.5
  F.Cu w0.25: 74.6,19.88 NT1.1@75.1,19.88
  other v1: 74.15,16.45 74.4,17.25 73.85,17.85
GND_PWR: C2.2 C3.2 C5.2 C7.2 C8.2 C9.2 C10.2 C11.2 C12.2 C13.2 C14.2 C15.2 C16.2 C17.2 C18.2 C19.2 C20.2 C21.2 D1.2 J1.2 NT1.2 NT2.2 NT3.2 R2.2 R3.2 R4.2 R6.2 R7.2 R8.2 R11.2 U1.2 U2.1 U2.2 U2.7 U3.2 U4.2 U5.2 | length 62.7
  F.Cu w0.2: v1(44.9,36.5) U2.7@46.2,36.5
  F.Cu w0.25: 74.6,11.48 NT2.2@75.1,11.48
  F.Cu w0.3: U1.2@18.7,30 v1(20,30) ; U2.1@42.3,38 42.8,38.5 v1(44.4,38.5) ; v1(59.01,40.1) R2.2@59.01,41 ; R11.2@66.51,11 v1(66.51,12.1)
  F.Cu w0.45: 71.463,14.002 71.465,14 U5.2@73.1,14
  F.Cu w0.541: R7.2@50.51,13 51.689,11.821 v1@53.01,11.821
  F.Cu w0.6: R6.2@48.51,41.5 48.51,40.648 48.98,40.178 ; C2.2@48.98,38 C2.2@48.98,38.156 ; R3.2@51.01,41 51.01,40.799 50.389,40.178 48.98,40.178 ; R8.2@53.01,11 v1@53.01,11.821 ; R4.2@53.51,39 53.51,38.789 52.877,38.156 C2.2@48.98,38.156 ; U4.2@55,18 v1(55,18.075) ; U3.2@55,46 v1(55,46.075) ; C5.2@70.475,22 C18.2@70.475,15 71.463,14.012 71.463,14.002 ; C15.2@70.475,43 70.475,43.474 71.878,44.877 75.475,44.877 ; C3.2@70.475,50 70.475,49.526 71.894,48.108 75.475,48.108 ; C19.2@75.475,17.75 76.1,18.375 NT1.2@76.1,19.88 76.1,21.375 C17.2@75.475,22 ; C16.2@75.475,43 75.475,44.877 ; C14.2@75.475,50 75.475,48.108 ; C8.2@75.675,6 75.675,6.825 76.1,7.25 NT3.2@76.1,8 ; C2.2@48.98,38.156 48.98,40.178 ; 75.475,44.877 75.475,48.108
  F.Cu w1: v1(50.475,18) v1(52.35,18.775) ; v1(50.475,46) v1(52.35,46.775)
  other v1: 10.45,4.05 13.95,4.05 17.45,4.05 83.95,4.05 87.45,4.05 10.45,7.55 13.95,7.55 17.45,7.55 27.95,7.55 76.95,8.85 77.55,9.45 76.445,9.474 74.55,10.95 3.45,11.05 6.95,11.05 10.45,11.05 13.95,11.05 17.45,11.05 27.95,11.05 31.45,11.05 38.45,11.05 83.95,11.05 87.45,11.05 73.75,11.25 53.01,11.87 74.35,11.85 51.314,12.667 70.75,14 3.45,14.55 6.95,14.55 10.45,14.55 13.95,14.55 17.45,14.55 27.95,14.55 31.45,14.55 38.45,14.55 87.45,14.55 69.748,16.755 55,17.475 3.45,18.05 6.95,18.05 10.45,18.05 13.95,18.05 17.45,18.05 27.95,18.05 31.45,18.05 38.45,18.05 76.336,19.921 76.65,20.85 3.45,21.55 6.95,21.55 10.45,21.55 31.45,21.55 38.45,21.55 87.45,21.55 3.45,25.05 6.95,25.05 10.45,25.05 38.45,25.05 87.45,25.05 52,28 80.45,28.55 87.45,28.55 6.95,32.05 76.95,32.05 80.45,32.05 87.45,32.05 17.646,35.352 3.45,35.55 6.95,35.55 10.45,35.55 24.45,35.55 27.95,35.55 73.45,35.55 76.95,35.55 87.45,35.55 34.748,35.755 53.843,38.196 48.98,38.86 3.45,39.05 6.95,39.05 10.45,39.05 13.95,39.05 17.45,39.05 20.95,39.05 24.45,39.05 27.95,39.05 31.45,39.05 34.95,39.05 83.95,39.05 87.45,39.05 42.766,40.333 51.625,40.385 48.843,40.696 3.45,42.55 6.95,42.55 10.45,42.55 13.95,42.55 17.45,42.55 20.95,42.55 24.45,42.55 27.95,42.55 31.45,42.55 34.95,42.55 80.45,42.55 83.95,42.55 87.45,42.55 77.375,43 69.748,44.755 55,45.475 3.45,46.05 6.95,46.05 10.45,46.05 13.95,46.05 17.45,46.05 20.95,46.05 24.45,46.05 27.95,46.05 31.45,46.05 34.95,46.05 69.95,46.05 73.45,46.05 76.95,46.05 80.45,46.05 83.95,46.05 87.45,46.05 71.202,48.245 3.45,49.55 6.95,49.55 10.45,49.55 13.95,49.55 17.45,49.55 20.95,49.55 24.45,49.55 27.95,49.55 31.45,49.55 34.95,49.55 38.45,49.55 41.95,49.55 45.45,49.55 48.95,49.55 80.45,49.55 83.95,49.55 87.45,49.55 77.375,50 10.45,53.05 13.95,53.05 17.45,53.05 20.95,53.05 24.45,53.05 27.95,53.05 31.45,53.05 34.95,53.05 38.45,53.05 41.95,53.05 45.45,53.05 48.95,53.05 52.45,53.05 55.95,53.05 59.45,53.05 62.95,53.05 76.95,53.05 87.45,53.05 10.45,56.55 13.95,56.55 17.45,56.55 20.95,56.55 24.45,56.55 27.95,56.55 31.45,56.55 34.95,56.55 38.45,56.55 41.95,56.55 45.45,56.55 48.95,56.55 52.45,56.55 55.95,56.55 59.45,56.55 62.95,56.55 66.45,56.55 69.95,56.55 73.45,56.55 76.95,56.55 87.45,56.55
I2C2_SCL: J2.11 R13.2 TP9.1 U2.5 | length 74.4
  F.Cu w0.2: U2.5@41.8,36 42.7,36 v1(43.2,35.2)
  F.Cu w0.25: TP9.1@45.32,4 v1(45.32,5.4) ; R13.2@75.11,3.5 76.2,3.5 76.9,4.2 76.9,7.1 J2.11@78.08,8
  B.Cu w0.25: v1(43.2,35.2) 42.726,34.726 42.726,7.801 45.127,5.4 v1(45.32,5.4) 62,9.5 73.5,9.5 v1(76.9,6.1)
I2C2_SDA: J2.12 R14.2 TP10.1 U2.4 | length 81.1
  F.Cu w0.2: U2.4@41.8,36.5 v1(43.9,36.5)
  F.Cu w0.25: v1(46.994,5.075) 47.86,4.209 TP10.1@47.86,4 v1(47.86,7.1) ; R14.2@75.11,2 76.6,2 78.08,3.5 J2.12@78.08,5
  B.Cu w0.25: v1(43.9,36.5) 43.613,36.5 42.275,35.161 42.275,7.532 45.097,4.71 46.629,4.71 v1(46.994,5.075) ; v1(47.86,7.1) 61.8,10.2 74.2,10.2 78.08,6.32 J2.12@78.08,5
LM74700_VCAP: C1.1 U1.1 | length 3.2
  F.Cu w0.5: U1.1@18.7,30.95 C1.1@19.52,34
MODE_3V3: R8.1 R9.1 U4.7 | length 17.2
  F.Cu w0.2: U4.7@54.415,18.875 v1(54.415,21.3) ; v1(54.49,10.1) R9.1@54.49,11
  F.Cu w0.25: R8.1@52.05,10.85 52.55,10.35 54.25,10.35 54.35,10.25 v1@54.45,10.25
  B.Cu w0.2: v1(54.415,21.3) 54.2,19.5 54.2,16 v1(54.49,10.1)
MODE_3V8: R4.1 R5.1 U3.7 | length 17.8
  F.Cu w0.2: U3.7@54.415,46.875 v1(54.415,49.3) ; v1(54.99,38.1) R5.1@54.99,39
  F.Cu w0.5: R4.1@52.49,39 52.49,39.156 53.128,39.794 54.196,39.794 R5.1@54.99,39
  B.Cu w0.2: v1(54.415,49.3) 54.2,47.5 54.2,44 v1(54.99,38.1)
PG_3V8: R15.1 TP5.1 U3.5 | length 66.5
  F.Cu w0.2: U3.5@56,47.1 56,47.6 v1(56.6,48.2)
  F.Cu w0.201: U3.5@56,47.1 U3.5@56,46.9 56.01,46.9 U3.5@56.112,46.798
  F.Cu w0.25: TP5.1@35.16,4 41.686,10.526 v1(43.357,10.526) ; U3.5@56.112,46.798 56.175,46.735 U3.5@56.175,46.7 ; v1(59.857,38.867) R15.1@60.49,39.5
  B.Cu w0.25: v1(43.357,10.526) 43.357,33.978 47.031,37.652 53.156,37.652 53.363,37.444 58.435,37.444 v1(59.857,38.867) 59.857,44.943 v1(56.6,48.2)